# Altium PCB switch-box.PcbDoc (part 3 of 3)
Units mil, origin at the board's own origin, x right, y up, seen from the top; angles counter-clockwise.
Board outline 6943 x 3911 mil, 2 copper layers (Top Layer, Bottom Layer), stack 57 mil thick; 98 components, 104 nets, 383 pads, 129 vias.
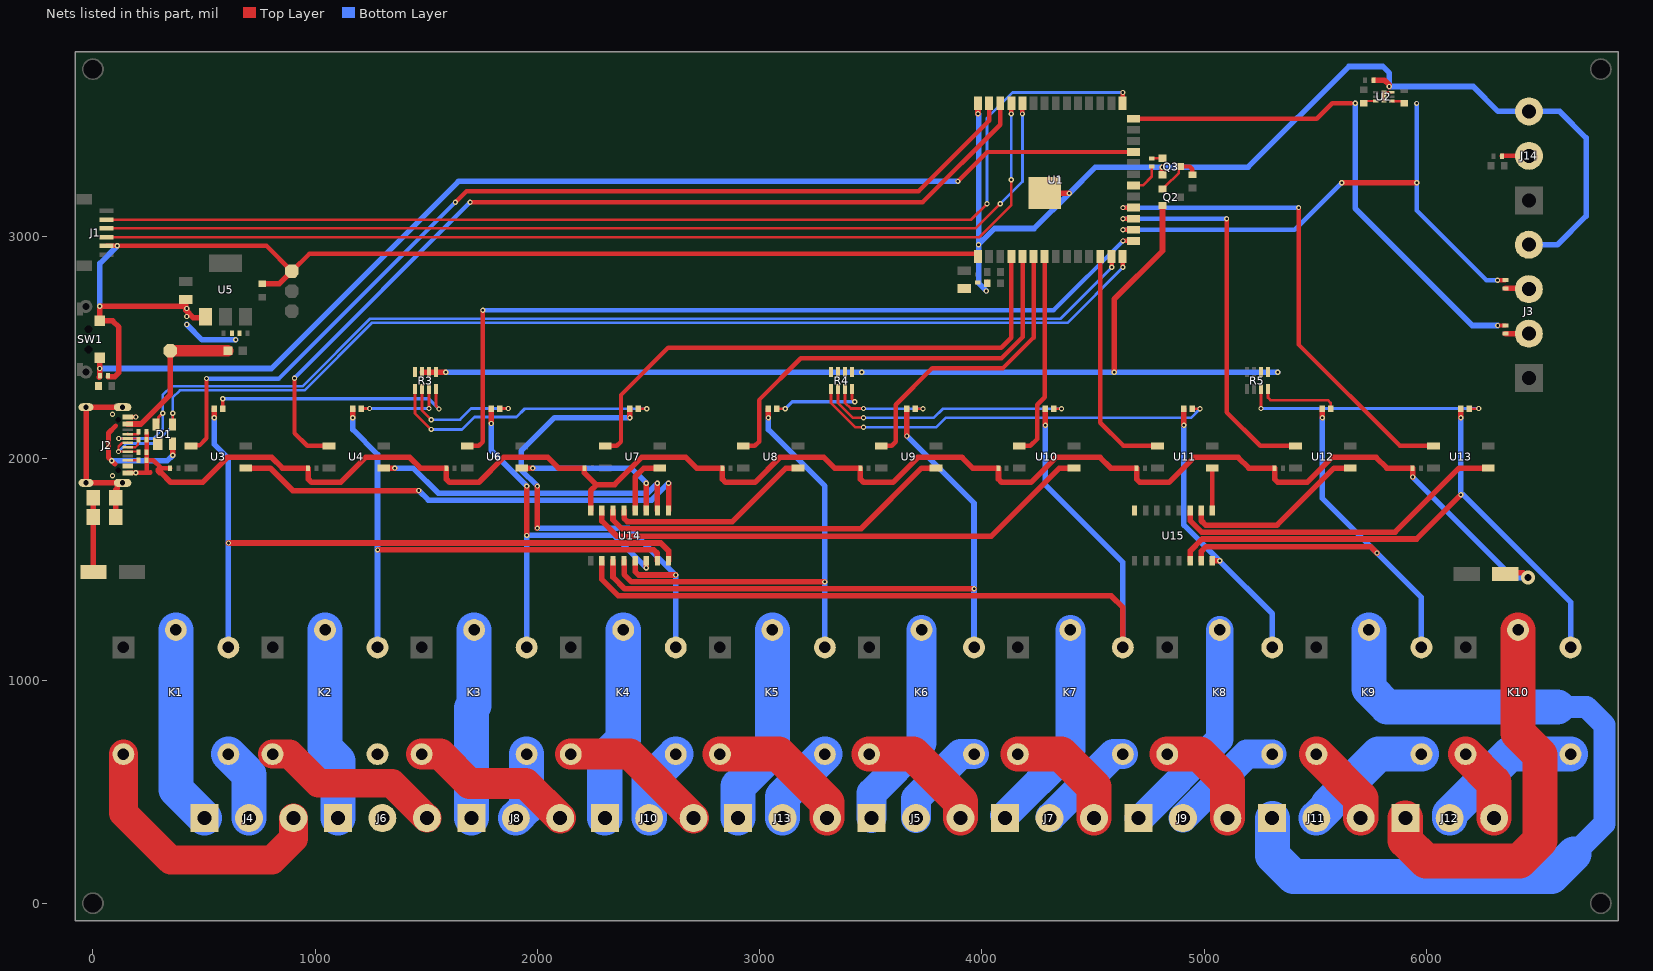
[diagram p2: the nets of this part, all layers, seen from the top]

## Via types
v1: diameter 23.62, hole 11.81, Top Layer to Bottom Layer, tented both sides, 101 vias
v2: diameter 23.62, hole 11.81, Top Layer to Bottom Layer, 18 vias
v3: diameter 62.99, hole 31.5, Top Layer to Bottom Layer, tented both sides, 10 vias

## Nets (pads, with @x,y where several pads share a name; then routed paths per layer and width w, separated by ;. In a path a pad name is that pad's centre, name@x,y a point inside that pad or via, vN(x,y) a via of type N, cw(c..) or ccw(c..) an arc to the next point about the centre after c; other vN are vias at no path point) (continued)
GND: C1.2 C2.2 C3.1 C4.1 C5.2 C8.2 C9.2 C10.2 C11.2 C12.2 C13.2 C14.2 C21.2 C22.2 D1.1 J1.2 J2.A1/B12 J2.B1/A12 J3.4 J14.3 P15.1 Q3.2 R12.1 R13.1 R14.1 R20.1 R21.1 R22.1 R23.1 R24.1 R25.1 R26.1 R27.1 R28.1 R29.1 SW1.2 U1.1 U1.40 U1.41 U2.6 U2.7 U5.1 U14.8 U15.8 | length 19189.1
  Top Layer w10: U2.7@5808.66,3629.46 5808.66,3643.13 5814.69,3649.15 U2.6@5844.78,3649.15
  Top Layer w12: J2.B1/A12@144.19,1935.86 J2.B1/A12@156,1935.86 ; J2.A1/B12@144.19,2187.83 J2.A1/B12@156,2187.83
  Top Layer w20: J1.2@60.7,2957.94 v1(109.51,2957.94) ; v1@110,2957.94 735,2957.94 781.06,2957.94 P15.1@895,2844 974.03,2923.03 3974.68,2923.03 3982.39,2915.31 U1.1@3982.39,2910.51 ; J2.B1/A12@154,1936.83 v1@193,1936.83 ; J2.A1/B12@156,2187.83 193,2187.83 v1(193,2188) v1@193,2189 ; v1(193,1937) 257,1937 259,1939 ; 241.5,1947.57 R13.1@241.5,1993 ; R12.1@241.5,2117.5 C12.2@241.5,2085 C11.2@241.5,2030 R13.1@241.5,1993 ; R20.1@347.5,1958 307,1958 272,1993 R13.1@241.5,1993 ; C3.1@4024,2794 C3.1@4024,2796.04
  Top Layer w25: C10.2@2,1824 2.39,1823.61 C21.2@2.39,1490 ; v1(31,2686) 412,2686 v2@418,2680 ; v1@31.18,2685.82 SW1.2@31.18,2620.4 88.6,2620.4 117,2592 117,2388 99,2370 C4.1@68.5,2370 ; 293,1951 293,1946 301.5,1937.5 306.5,1937.5 350,1894 493.44,1894 605.44,2006 804.44,2006 852.44,1958 R21.1@968.72,1958 968.72,1908.64 983.37,1894 1114.67,1894 1226.67,2006 1425.67,2006 1473.67,1958 R22.1@1589.94,1958 1589.94,1908.64 1604.59,1894 1735.89,1894 1847.89,2006 2046.89,2006 2094.89,1958 R23.1@2211.17,1958 2211.17,1936.83 2265.5,1882.5 ; C9.2@418,2717 v2@418,2680 ; v2(422,2676) v2@418,2680 ; U5.1@506,2640 501,2635 451.2,2635 418,2668.2 v2@418,2680 ; C8.2@762,2787 838,2787 P15.1@895,2844 ; U14.8@2240,1767.19 2240,1857 2265.5,1882.5 ; v1(3982.39,3552.69) U1.40@3982.39,3599.49 ; U1.41@4284.39,3195.94 4286.34,3194 v1(4393,3194) ; v1(4812,3312) 4812,3278.23 Q3.2@4812.63,3277.6 ; C5.2@5765.5,3704 5810.5,3704 5833.31,3681.19 v1(5833.31,3675) ; v1(5938.5,1917.81) R29.1@5938.5,1958 5822.22,1958 5774.22,2006 5575.22,2006 5463.22,1894 5331.92,1894 5317.28,1908.64 R28.1@5317.28,1958 5201,1958 5153,2006 4954,2006 4842,1894 4710.7,1894 4696.06,1908.64 R27.1@4696.06,1958 4579.78,1958 4531.78,2006 4332.78,2006 4220.78,1894 4089.48,1894 4074.83,1908.64 R26.1@4074.83,1958 3958.56,1958 3910.56,2006 3711.56,2006 3599.56,1894 3468.26,1894 3453.61,1908.64 R25.1@3453.61,1958 3337.33,1958 3289.33,2006 3090.33,2006 2978.33,1894 2847.03,1894 2832.39,1908.64 R24.1@2832.39,1958 2716.11,1958 2668.11,2006 2469.11,2006 2347.11,1884 2267,1884 2265.5,1882.5 ; C22.2@6346.61,1488 v3@6436.8,1488
  Bottom Layer w25: v1(31,2686) 31,2879.44 v1(109.51,2957.94) ; v2(422,2604) 491,2535 v2(642,2535) ; v1(3982.39,3552.69) 3985,3550.08 v1(3985,2963.5) ; v1(4020,2755) 3985,2790 v1(3985,2963.5) ; v1(5938.5,1917.81) 6390.66,1465.65 v3(6457.65,1465.65) ; J3.4@6461,2963 6590,2963 6719,3092 6719,3444 6600,3563 J14.3@6462,3563 6323,3563 6211,3675 v1(5833.31,3675) 5833.31,3735.69 5804,3765 5651,3765 5198,3312 v1(4812,3312) 4511,3312 v1(4393,3194) 4235,3036 4057.5,3036 v1(3985,2963.5)
  other v1: 88,1923 88,2200.69
  other v2: 422,2640
IN_1: J4.2 K1.3 | length 326
  Bottom Layer w158: K1.3@609.53,670.74 702,578.27 J4.2@702,383
IN_2: J6.2 K2.3
IN_3: J8.2 K3.3 | length 308
  Bottom Layer w158: J8.2@1902.67,383 1951.56,431.9 K3.3@1951.56,670.74
IN_4: J10.2 K4.3 | length 337.3
  Bottom Layer w158: J10.2@2503,383 2503,551.16 K4.3@2622.58,670.74
IN_5: J13.2 K5.3 | length 365.9
  Bottom Layer w158: J13.2@3102.25,384.08 3102.25,479.39 K5.3@3293.6,670.74
IN_6: J5.2 K6.3 | length 432.1
  Bottom Layer w135: J5.2@3703.67,383 3703.67,471.67 3902.74,670.74 K6.3@3964.61,670.74
IN_7: J7.2 K7.3 | length 442.4
  Bottom Layer w135: J7.2@4308.97,387.97 4591.74,670.74 K7.3@4634.22,670.74
IN_8: J9.2 K8.3 | length 521.8
  Bottom Layer w130: J9.2@4904.33,383 4904.33,383.54 5191.54,670.74 K8.3@5306.65,670.74
IN_9: J11.2 K9.3 | length 596.8
  Bottom Layer w158: J11.2@5504.67,383 5557.67,436.01 5557.67,443.89 5784.53,670.74 K9.3@5977.66,670.74
IN_10: J12.2 K10.3 | length 674
  Bottom Layer w158: J12.2@6105,383 6105,402 6373.74,670.74 K10.3@6648.68,670.74
IO0_: J1.5 U1.27 | length 5085.6
  Top Layer w12: J1.5@60.7,3076.06 3952.06,3076.06 v1(4023,3147)
  Top Layer w20: U1.27@4634.39,3599.49 v1(4634.39,3648.29)
  Bottom Layer w12: v1(4023,3147) 4023,3533 4138.29,3648.29 v1(4634.39,3648.29)
IO12: R16.2 U1.20 | length 142
  Top Layer w12: U1.20@4683.61,3230.2 4725.2,3230.2 4764,3269 R16.2@4764,3314.5
IO_1: U1.39 U3.1 | length 4432.2
  Top Layer w20: U3.1@441.24,2058 443.24,2060 479.28,2060 511,2091.72 v1(511,2361) ; v1(1631,3154) 1681,3204 3715,3204 4032.39,3521.39 U1.39@4032.39,3599.49
  Bottom Layer w20: v1(511,2361) 837,2361 1629.31,3153.31 v1@1630,3153.98
IO_2: U1.38 U4.1 | length 4170.5
  Top Layer w20: v1(907,2362.81) 907,2115 964,2058 U4.1@1062.48,2058 ; v1(1697,3154) 3733,3154 4082.39,3503.39 U1.38@4082.39,3599.49
  Bottom Layer w20: v1@907,2364 907.21,2364 908.81,2365.6 908.81,2365.81 v1(1697,3154)
IO_3: U1.15 U6.1 | length 3725.8
  Top Layer w20: U6.1@1683.72,2058 1735.65,2058 1754.75,2077.1 v1(1754.75,2667.75) ; v1(4634.8,2980.2) U1.15@4681.61,2980.2
  Bottom Layer w20: v1@1754.75,2668 4322.61,2668 v1(4634.8,2980.2)
IO_4: U1.4 U7.1 | length 2518
  Top Layer w20: U7.1@2304.96,2058 2356.89,2058 2375.99,2077.1 2375.99,2286.99 2588,2499 4087,2499 4132.39,2544.39 U1.4@4132.39,2910.51
IO_5: U1.5 U8.1 | length 1933.7
  Top Layer w20: U8.1@2926.2,2058 2978.13,2058 2997.23,2077.1 2997.23,2264.23 3185,2452 4088.23,2452 4184,2547.77 4184,2908.91 U1.5@4182.39,2910.51
IO_6: U1.6 U9.1 | length 1349.8
  Top Layer w20: U9.1@3547.44,2058 3547.51,2058.08 3594.08,2058.08 3612,2076 3612,2243 3777,2408 4095,2408 4232.39,2545.39 U1.6@4232.39,2910.51
IO_7: U1.7 U10.1 | length 928.5
  Top Layer w20: U10.1@4168.67,2058 4218,2058 4249,2089 4249,2242.8 4282.39,2276.2 U1.7@4282.39,2910.51
IO_8: U1.12 U11.1 | length 1048.8
  Top Layer w20: U1.12@4532.39,2910.51 4532.39,2162.61 4637,2058 U11.1@4789.91,2058
IO_9: U1.17 U12.1 | length 1758.5
  Top Layer w20: v1(4634.8,3080.2) U1.17@4681.61,3080.2 U1.17@4683.61,3080.2 ; v1(5101,3080) 5101,2209 5252,2058 U12.1@5411.15,2058
  Bottom Layer w20: v1@4635,3080 v1(5101,3080)
IO_10: U1.18 U13.1 | length 2249.5
  Top Layer w20: v1(4634.8,3130.2) U1.18@4681.61,3130.2 ; v1(5425,3130.2) 5425,2514 5881,2058 U13.1@6032.39,2058
  Bottom Layer w20: v1(4634.8,3130.2) v1(5425,3130.2)
LED_VCC: Q2.2 R3.1 R3.2 R3.3 R3.4 R4.1 R4.2 R4.3 R4.4 R5.1 R5.2 | length 4690.1
  Top Layer w25: R3.3@1480.87,2389.82 R3.2@1512.36,2389.82 R3.1@1543.86,2389.82 v2(1587.82,2389.82) ; v1(4595.63,2389.82) 4595.63,2718.63 4812.63,2935.63 Q2.2@4812.63,3139.6
  Bottom Layer w25: v2(1587.82,2389.82) v2(3459.56,2389.82) v1(4595.63,2389.82) v2(5331.3,2389.82)
NC_1: J4.1 K1.4 | length 900.1
  Bottom Layer w158: K1.4@373.31,1229.8 373.31,511.69 J4.1@502,383
NC_2: J6.1 K2.4 | length 870.8
  Bottom Layer w158: K2.4@1044.33,1229.8 1044.33,698.67 1102.33,640.67 J6.1@1102.33,383
NC_3: J8.1 K3.4 | length 852
  Bottom Layer w158: J8.1@1702.67,383 1702.67,877.67 1715.34,890.34 K3.4@1715.34,1229.8
NC_4: J10.1 K4.4 | length 881.3
  Bottom Layer w158: J10.1@2303,383 2303,656 2386.36,739.36 K4.4@2386.36,1229.8
NC_5: J13.1 K5.4 | length 910.6
  Bottom Layer w158: J13.1@2903.33,383 2903.33,526.33 3057.38,680.38 K5.4@3057.38,1229.8
NC_6: J5.1 K6.4 | length 939.9
  Bottom Layer w135: J5.1@3503.67,383 3503.67,495.67 3728.39,720.39 K6.4@3728.39,1229.8
NC_7: J7.1 K7.4 | length 956.6
  Bottom Layer w135: J7.1@4104,395 4398,689 K7.4@4398,1229.8
NC_8: J9.1 K8.4 | length 1004
  Bottom Layer w125: J9.1@4704.83,383.49 4715.49,383.49 5070.43,738.43 K8.4@5070.43,1229.8
NC_9: J11.1 K9.4 | length 3636.4
  Bottom Layer w100: J11.1@5304.67,383 J11.1@5307,380.67 ; 6589,883 6720,883 6801,802 6801,358 6665,222
  Bottom Layer w158: J11.1@5307,380.67 5307,215 5402,120 6563,120 6665,222 ; K9.4@5741.44,1229.8 5741.44,965.56 5824,883 6589,883
NC_10: J12.1 K10.4 | length 1771.2
  Top Layer w158: J12.1@5905,383 5905,282.55 5997.55,190 6418.45,190 6511,282.55 6511,667 6412.46,765.54 K10.4@6412.46,1229.8
NetJ2_A5: J2.A5 R12.2 | length 47.5
  Top Layer w12: J2.A5@156.03,2111.03 R12.2@203.47,2111.03
NetJ2_B5: J2.B5 R13.2 | length 49.8
  Top Layer w12: J2.B5@156,1992.94 200.5,1992.94 203.5,1995.94 R13.2@203.5,1997
NetJ3_2: J3.2 R7.1 | length 105.9
  Top Layer w25: R7.1@6356,2562.5 6460.5,2562.5 J3.2@6461,2563
  Bottom Layer w20: J3.2@6460.5,2562.5 J3.2@6461,2563
NetJ3_3: J3.3 R8.1 | length 106.4
  Top Layer w25: R8.1@6356,2766.5 6457.5,2766.5 J3.3@6461,2763
NetJ14_2: J14.2 R6.1 | length 122.9
  Top Layer w20: R6.1@6339.5,3362 6340,3362.5 6461.5,3362.5 J14.2@6462,3363
NetLED1_1: LED1.1 R3.8 | length 1132.1
  Top Layer w12: R3.8@1543.86,2313.05 1543.86,2237.14 v1(1557,2224)
  Top Layer w15: LED1.1@583.76,2225 v1(583.76,2270.24)
  Bottom Layer w15: v1(583.76,2270.24) 1510.76,2270.24 v1(1557,2224)
NetLED2_1: LED2.1 R3.7 | length 392.4
  Top Layer w12: LED2.1@1207,2226 v1(1245,2226) ; v1(1512.36,2226) R3.7@1512.36,2313.05
  Bottom Layer w12: v1(1245,2226) v1(1512.36,2226)
NetLED3_1: LED3.1 R3.6 | length 559
  Top Layer w12: R3.6@1480.87,2313.05 1480.87,2217.13 v1(1522,2176) ; LED3.1@1830.24,2226 v1(1868.24,2226)
  Bottom Layer w12: v1(1522,2176) 1652,2176 1702,2226 v1(1868.24,2226)
NetLED4_1: LED4.1 R3.5 | length 1257.1
  Top Layer w12: R3.5@1449.37,2313.05 1449.37,2204.63 v1(1522,2132) ; LED4.1@2453.48,2225 v1(2491.48,2225)
  Bottom Layer w12: v1(1522,2132) 1661,2132 1717,2188 1906,2188 1943,2225 v1(2491.48,2225)
NetLED5_1: LED5.1 R4.8 | length 425.7
  Top Layer w12: LED5.1@3076.72,2225 v1(3114.72,2225) ; R4.8@3415.6,2313.05 3415.6,2269.4 v2(3428,2257)
  Bottom Layer w15: v1(3114.72,2225) 3146.72,2257 v2(3428,2257)
NetLED6_1: LED6.1 R4.7 | length 458.1
  Top Layer w12: R4.7@3384.1,2313.05 3384.1,2251.9 3410,2226 v1(3467,2226) ; LED6.1@3699.96,2225 v1(3734.95,2225)
  Bottom Layer w12: v1(3467,2226) 3467.5,2225.5 3734.45,2225.5 v1(3734.95,2225)
NetLED7_1: LED7.1 R4.6 | length 1150.1
  Top Layer w12: R4.6@3352.61,2313.05 3352.61,2251.39 3420,2184 v1(3467,2184) ; LED7.1@4323.19,2225 v1(4358.19,2225) v1@4361.19,2225
  Bottom Layer w12: v1(3467,2184) 3783,2184 3824,2225 v1(4358.19,2225)
NetLED8_1: LED8.1 R4.5 | length 1837
  Top Layer w12: R4.5@3321.11,2313.05 3321.11,2250.89 3430,2142 v1(3467,2142) ; LED8.1@4946.43,2225 v1(4981.43,2225)
  Bottom Layer w12: v1(3467,2142) 3795,2142 3837,2184 4940.43,2184 v1(4981.43,2225)
NetLED9_1: LED9.1 R5.8 | length 356.4
  Top Layer w12: R5.8@5287.34,2313.05 5287.34,2275.18 5298.53,2264 5557,2264 5569.67,2251.33 LED9.1@5569.67,2225
NetLED10_1: LED10.1 R5.7 | length 1110.6
  Top Layer w12: v1(5256,2226) R5.7@5256,2313.05 ; LED10.1@6192.91,2225 6193.41,2225.5 6235.5,2225.5 v1(6236,2226)
  Bottom Layer w12: v1(5256,2226) v1(6236,2226)
NetQ2_1: Q2.1 Q3.3 Rx1.2 | length 225
  Top Layer w12: Q2.1@4812.63,3214.4 4814.6,3214.4 4824.74,3224.54 4886.12,3285.92 4886.12,3309.75 Q3.3@4891.37,3315
  Top Layer w20: Q3.3@4891.37,3315 4935,3315 4947,3303 Rx1.2@4947,3273
NetQ3_1: Q3.1 R16.1 | length 49
  Top Layer w12: R16.1@4764,3351.5 4764.45,3351.95 4812.18,3351.95 Q3.1@4812.63,3352.4
NO_1: J4.3 K1.5 | length 1249.4
  Top Layer w130: K1.5@137.09,670.74 137.09,406.83 350.02,193.89 805.2,193.89 902,290.69 J4.3@902,383
NO_2: J6.3 K2.5 | length 813.4
  Top Layer w130: K2.5@808.11,670.74 885.05,670.74 1015.79,540 1345.33,540 J6.3@1502.33,383
NO_3: J8.3 K3.5 | length 742.7
  Top Layer w140: K3.5@1479.12,670.74 1562.65,670.74 1694.73,538.66 1947.01,538.66 J8.3@2102.67,383
NO_4: J10.3 K4.5 | length 672
  Top Layer w140: K4.5@2150.14,670.74 2415.26,670.74 J10.3@2703,383
NO_5: J13.3 K5.5 | length 642.2
  Top Layer w158: K5.5@2821.16,670.74 3085.26,670.74 3303.33,452.67 J13.3@3303.33,383
NO_6: J5.3 K6.5 | length 574.2
  Top Layer w158: K6.5@3492.17,670.74 3690.26,670.74 3903.67,457.33 J5.3@3903.67,383
NO_7: J7.3 K7.5 | length 543.4
  Top Layer w158: K7.5@4161.78,670.74 4356.26,670.74 4504,523 J7.3@4504,383
NO_8: J9.3 K8.5 | length 484
  Top Layer w158: K8.5@4834.21,670.74 4978.26,670.74 5104.33,544.67 J9.3@5104.33,383
NO_9: J11.3 K9.5 | length 370.4
  Top Layer w158: K9.5@5505.22,670.74 5704.67,471.3 J11.3@5704.67,383
NO_10: J12.3 K10.5 | length 341.1
  Top Layer w158: K10.5@6176.24,670.74 6305,541.98 J12.3@6305,383
OUT_1: U3.3 U14.1 | length 2116.7
  Top Layer w25: U3.3@687.31,1958 798,1958 899,1857 v1(1466,1857) ; U14.1@2590,1767.19 v1(2590,1890)
  Bottom Layer w25: v1(1466,1857) 1509.06,1813.94 2513.94,1813.94 v1(2590,1890)
OUT_2: U4.3 U14.2 | length 1419.8
  Top Layer w25: U4.3@1308.54,1958 v1(1357.54,1958) ; U14.2@2540,1767.19 v1(2540,1890)
  Bottom Layer w25: v1(1357.54,1958) 1441,1958 1554.06,1844.94 2494.94,1844.94 v1(2540,1890)
OUT_3: U6.3 U14.3 | length 711.2
  Top Layer w25: U6.3@1929.78,1958 v1(1978.78,1958) ; U14.3@2490,1767.19 v1(2490,1890)
  Bottom Layer w25: v1(1978.78,1958) 2422,1958 v1(2490,1890)
OUT_4: U7.3 U14.4 | length 279
  Top Layer w25: U14.4@2440,1767.19 2440,1919 2479,1958 U7.3@2551.02,1958
OUT_5: U8.3 U14.5 | length 923.7
  Top Layer w25: U14.5@2390,1767.19 2390,1731.64 2404.64,1717 2877,1717 3118,1958 U8.3@3172.26,1958
OUT_6: U9.3 U14.6 | length 1624.5
  Top Layer w25: U14.6@2340,1767.19 2340,1725 2379,1686 3457,1686 3729,1958 U9.3@3793.5,1958
OUT_7: U10.3 U14.7 | length 2327.4
  Top Layer w25: U14.7@2290,1767.19 2290,1719 2357,1652 4043,1652 4349,1958 U10.3@4414.74,1958
OUT_8: U11.3 U15.1 | length 191.2
  Top Layer w20: U11.3@5035.98,1958 5035.98,1768.21 U15.1@5037,1767.19
OUT_9: U12.3 U15.2 | length 844.9
  Top Layer w25: U15.2@4987,1767.19 4987,1721 5007,1701 5328,1701 5585,1958 U12.3@5657.21,1958 U12.3@5671,1958
OUT_10: U13.3 U15.3 | length 1527.5
  Top Layer w25: U15.3@4937,1767.19 4937,1722 4989,1670 5859,1670 6147,1958 U13.3@6278.45,1958
RET_K1: K1.2 LED1.2 U14.16 | length 3139.8
  Top Layer w25: v1(546.36,2184.81) LED1.2@546.36,2225 ; v1(610,1621) 2555,1621 2590,1586 U14.16@2590,1540.81
  Bottom Layer w25: v1(546.36,2184.81) 546.36,2064.64 609.53,2001.47 K1.2@609.53,1151.06
RET_K2: K2.2 LED2.2 U14.15 | length 2419.7
  Top Layer w25: v1(1169.6,2184.81) LED2.2@1169.6,2225 LED2.2@1169.6,2226 ; v1(1281,1590) 2524,1590 2539.31,1574.69 2539.31,1541.5 U14.15@2540,1540.81
  Bottom Layer w25: v1(1169.6,2184.81) 1169.6,2130.81 1280.55,2019.86 K2.2@1280.55,1151.06
RET_K3: K3.2 LED3.2 U14.14 | length 1769.7
  Top Layer w25: v1(1792.84,2158.81) LED3.2@1792.84,2225 ; v1(1952,1655) v1(1952,1877) ; v1(2490,1509) U14.14@2490,1540.81
  Bottom Layer w25: v1(1792.84,2158.81) 1792.84,2036.16 v1(1952,1877) ; K3.2@1951.56,1151.06 v1@1951.56,1654.56 ; v1(1952,1655) 2344,1655 v1(2490,1509)
RET_K4: K4.2 LED4.2 U14.13 | length 2240.3
  Top Layer w25: v1(2000,1688) v1(2000,1877) ; v1(2416.08,2184.81) LED4.2@2416.08,2225 ; U14.13@2440,1540.81 2440,1492 2455,1477 v1(2622,1477)
  Bottom Layer w25: v1(2000,1688) 2411,1688 v1(2622,1477) ; v1(2000,1877) 1927,1950 1927,2034 2077.81,2184.81 v1(2416.08,2184.81) ; K4.2@2622.58,1151.06 v1@2622.58,1477
RET_K5: K5.2 LED5.2 U14.12 | length 2157.2
  Top Layer w25: U14.12@2390,1540.81 2390,1480 2424,1446 v1(3293,1446) ; v1(3039.32,2184.81) LED5.2@3039.32,2225
  Bottom Layer w25: v1(3039.32,2184.81) 3039.32,2130.81 3293.6,1876.53 K5.2@3293.6,1151.06
RET_K6: K6.2 LED6.2 U14.11 | length 2919.4
  Top Layer w25: U14.11@2340,1540.81 2340,1467 2392,1415 v1(3965,1415) ; v1(3662.55,2102.55) LED6.2@3662.55,2225
  Bottom Layer w25: v1(3662.55,2102.55) 3964.61,1800.49 3964.61,1415 K6.2@3964.61,1151.06
RET_K7: K7.2 LED7.2 U14.10 | length 3878.3
  Top Layer w25: U14.10@2290,1540.81 2290,1457 2364,1383 4582,1383 4634.22,1330.78 K7.2@4634.22,1151.06 ; v1(4285.79,2150.81) LED7.2@4285.79,2225
  Bottom Layer w25: v1(4285.79,2150.81) 4285.79,1882.21 4634.22,1533.78 K7.2@4634.22,1151.06
RET_K8: K8.2 LED8.2 U15.16 | length 1270.7
  Top Layer w25: v1(4909.03,2150.81) LED8.2@4909.03,2225 ; U15.16@5037,1540.81 5037.19,1541 v1(5070,1541)
  Bottom Layer w25: v1(4909.03,2150.81) 4909.03,1701.97 v1(5070,1541) ; v1@5070,1540 5306.65,1303.35 K8.2@5306.65,1151.06
RET_K9: K9.2 LED9.2 U15.15 | length 2112.7
  Top Layer w25: U15.15@4987,1540.81 4987.69,1541.5 4987.69,1583.69 5009,1605 5749,1605 v1(5778,1576) ; v1(5532.27,2184.81) LED9.2@5532.27,2225
  Bottom Layer w25: v1(5532.27,2184.81) 5532.27,1821.73 v1(5778,1576) 5977.66,1376.34 K9.2@5977.66,1151.06
RET_K10: K10.2 LED10.2 U15.14 | length 2651.8
  Top Layer w25: U15.14@4937,1540.81 4937.69,1541.5 4937.69,1585.69 4991,1639 5956,1639 v1(6155.51,1838.51) ; v1(6155.51,2184.81) LED10.2@6155.51,2225
  Bottom Layer w25: v1(6155.51,2184.81) v1(6155.51,1838.51) 6165.49,1838.51 6648.68,1355.32 K10.2@6648.68,1151.06
RST_: C4.2 R2.1 SW1.1 U1.23 | length 5148.2
  Top Layer w20: v1(3892,3248) 4024.2,3380.2 U1.23@4681.61,3380.2
  Top Layer w25: R2.1@25,2322 R2.1@27.5,2324.5 ; C4.2@27.5,2366 31.5,2370 31.18,2370.32 v1(31.18,2406.24) SW1.1@31.18,2455.05
  Bottom Layer w25: v1(31.18,2406.24) 803.24,2406.24 1645,3248 v1(3892,3248)
RXD_: J1.4 U1.36 | length 4564.8
  Top Layer w12: J1.4@57,3035 58.69,3036.69 J1.4@60.7,3036.69 3972.19,3036.69 v1(4082.5,3147)
  Top Layer w20: v1(4182.39,3551.69) U1.36@4182.39,3598.49
  Bottom Layer w12: v1(4082.5,3147) 4182.39,3246.89 v1(4182.39,3551.69)
SCL: R7.2 R17.1 U1.26 U2.3 | length 2419.4
  Top Layer w10: R17.1@5728.54,3609.78 U2.3@5772.54,3609.78
  Top Layer w20: U1.26@4683.61,3530.2 5507.2,3530.2 5577,3600 5662,3600 ; v1(6320.5,2599.5) R7.2@6356,2599.5
  Bottom Layer w25: v1(5680,3600) 5680,3126 6206.5,2599.5 v1(6320.5,2599.5)
SDA: R8.2 R18.1 U1.16 U2.4 | length 2529.2
  Top Layer w10: U2.4@5844.78,3609.78 5845,3610 5846.13,3608.87 5890.13,3608.87 R18.1@5900,3599
  Top Layer w20: v1(4634.8,3030.2) U1.16@4681.61,3030.2 U1.16@4683.61,3030.2 ; v1(6320,2803) R8.2@6355.5,2803
  Top Layer w25: v1(5619.8,3242.2) v1(5956.2,3242.2)
  Bottom Layer w20: v1(4634.8,3030.2) 5407.8,3030.2 v1(5619.8,3242.2) ; v1@5956,3242.2 v1(5956,3599) ; v1(5956.2,3242.2) 5956.2,3117 6270.2,2803 v1(6320,2803)
Shell_: C10.1 J2.S1 J2.S2 J2.S3 J2.S4 R14.2 | length 830.7
  Top Layer w25: R14.2@102,1738 C10.1@102,1824 102,1860.01 109.91,1867.92 109.91,1886.75 J2.S1@114.73,1891.57 ; J2.S1@133.56,1891.57 J2.S1@114.73,1891.57 ; J2.S4@133.56,2232.12 J2.S3@-31.01,2232.12 J2.S2@-31.01,1891.57 J2.S1@114.73,1891.57
  Bottom Layer w25: J2.S3@-31.01,2232.12 J2.S3@-29.5,2230.61
TXD_: J1.3 U1.37 | length 4588.2
  Top Layer w12: J1.3@61,2997.31 3988.32,2997.32 4132.39,3141.39 v1(4132.39,3255.39)
  Top Layer w20: v1(4132.39,3551.69) U1.37@4132.39,3598.49
  Bottom Layer w12: v1(4132.39,3255.39) v1(4132.39,3551.69)
USB_DM: C12.1 D1.4 J2.A7 J2.B7 U1.13 | length 5153.5
  Top Layer w10: v1(116,2091.37) J2.B7@156,2091.37 ; J2.A7@156,2052 191,2052 202.89,2063.89 202.89,2083.39 C12.1@204.5,2085 198.04,2091.46 J2.B7@156.91,2091.46
  Top Layer w12: D1.4@284.2,2153.61 293.94,2163.36 293.94,2184.94 v1(314,2205)
  Top Layer w20: v1(4584.39,2861.71) U1.13@4584.39,2910.51
  Bottom Layer w12: v1(116,2091.37) 272.37,2091.37 314,2133 v1(314,2205) 314,2286 354,2326 943.54,2326 1247.54,2630 4352.69,2630 v1(4584.39,2861.71)
USB_DP: C11.1 D1.3 J2.A6 J2.B6 U1.14 | length 5198.9
  Top Layer w10: J2.B6@155.09,2032.22 v1(115.09,2032.22) 115.09,2055.09 130.78,2070.78 155.09,2070.78 J2.A6@156,2071.69 ; J2.B6@155.09,2033.22 J2.B6@156,2032.31 J2.B6@156.91,2031.41 ; J2.B6@156.91,2032.41 C11.1@203.09,2032.41 ; C11.1@203.09,2031.41 C11.1@204.5,2030
  Top Layer w12: D1.3@359,2153.61 v1(359,2205)
  Top Layer w20: v1(4634.39,2861.71) U1.14@4634.39,2910.51
  Bottom Layer w12: v1(115.09,2032.22) 151.87,2069 280,2069 359,2148 v1(359,2205) 359,2275 392,2308 951,2308 1254.51,2611.51 4384.19,2611.51 v1(4634.39,2861.71)
VUSB: D1.2 F1.1 J2.A4/B9 J2.B4/A9 P2.1 | length 1245.5
  Top Layer w12: J2.A4/B9@151.09,2151.42 J2.A4/B9@156,2156.33
  Top Layer w22: 98.64,1976.36 v1(84.32,1990.68) 70,2005 70,2116 102.51,2148.51
  Top Layer w25: J2.A4/B9@156,2156.33 215.33,2156.33 348.39,2289.39 P2.1@348.39,2486 ; v1(359,2015.61) D1.2@359,2067
  Top Layer w50: P2.1@347,2486 P2.1@348,2486 348.39,2486 F1.1@607.54,2486
  Bottom Layer w25: v1(84.32,1990.68) 334.07,1990.68 v1(359,2015.61)
pads on no net: J1.MP1 J1.MP2 J2.A8 J2.B8 J2.MH R5.3 R5.4 R5.5 R5.6 SW1.3 SW1.4 SW1.5 SW1.6 SW1.MH0 SW1.MH1 U1.8 U1.9 U1.10 U1.11 U1.19 U1.22 U1.24 U1.25 U1.28 U1.29 U1.30 U1.31 U1.32 U1.33 U1.34 U1.35 U2.2 U2.5 U15.4 U15.5 U15.6 U15.7 U15.10 U15.11 U15.12 U15.13

## Polygon pours and split planes (outlines as drawn)
GND on Top Layer "GND_L01_P000" (hatched 45Degree grid 20 track 8, remove dead copper, pour order 0): -22,3776 6807,3776 6807,1435 -22,1435
GND on Bottom Layer "GND_L02_P001" (hatched 45Degree grid 20 track 8, remove dead copper, pour order 1): -22,3776 6807,3776 6807,1435 -22,1435

## Other copper
Top Layer:
  rectangle net LED_VCC: 5246,2362 5348.1,2415
  rectangle net LED_VCC: 3309.36,2362 3476.36,2415
  rectangle net LED_VCC: 1437.61,2362 1604.61,2415
  rectangle net GND: 234,1925 314,2096
  rectangle net GND: 78,2193.69 180,2208.69
  rectangle net GND: 78,1915 180,1930
  rectangle net GND: -62,1381 50,1862
  rectangle net VUSB: 97,1965.69 179,1980.69
  rectangle net VUSB: 97,2143 184,2158
  rectangle net RST_: 10,2306 44,2386
  rectangle net Data: 6275,3300 6313,3377
  rectangle net 3V3: 5700,3643 5739,3718
  rectangle net GND: 3888,2741 4043.75,2810.75
  rectangle net GND: 3959,2881 4005,2977
  rectangle net 3V3: 3887,2822 4054,2870
  rectangle net GND: 6287,1377 6515,1527
  rectangle net 5V: 4866,3141 4966,3233
  region net 5V: 868,2097 868,2493 748,2493 748,2097
  rectangle net 5V: 4639,1391 4714,1621
  rectangle net 5V: 4647,1391 5117,1485
  rectangle net 5V: 5093,1392 6247,1525
  rectangle net 5V: 4639,1593 4727,1658
  rectangle net 5V: 2768,1503 4714,1611
  rectangle net 5V: 85,1456 2258,1564
  rectangle net 5V: 685,2466 933,2561
  rectangle net 3V3: 383,2773 727,2938
  region net GND: 544.4,2743.84 379,2743.84 379,2523 544.4,2523
  region net SCL: 5785.67,3616.91 5662,3616.91 5662,3575.91 5785.67,3575.91
  rectangle net SDA: 5833,3576 5971,3617
  rectangle net GND: 617,2519 669,2583
  region net 5V: 655,2746.5 655,2596 788,2596 788,2746.5
  region net 5V: 933,2705 685,2705 685,2546 933,2546
  rectangle net 3V3: 563,2523 603,2610
  rectangle net 3V3: 563,2597 637,2790
  rectangle net GND: 5798,3643 5857,3718
  rectangle net 3V3: 5700,3643 5787,3676
  rectangle net 3V3: 4011,2822 4054,2977
Bottom Layer:
  rectangle net IN_2: 1214,316 1375,735
  rectangle net 5V: 790,2589 842,2706
  rectangle net 3V3: 385,2738 939,2958

## Silkscreen, mask and mechanical layers (free items; w line width, h text height)
Top Overlay:
  drawing of 313 lines, arcs and shapes, not listed
  text "Note:" at 76,3739 h100
  text "JLCJLCJLCJLC" at 2971,3712.02 h85
  text "* >>Cap TBD" at 76,3630.6 h100
  text "SENSOR" at 5627.9,3499.79 h100
  text "GND" at 6139.96,2912.11 h120
  text "GND" at 934.96,2807.79 h100
  text "PROGRAM." at 182.21,2769.52 h100 r90
  text "SDA" at 6094.96,2729.12 h120
  text "3V3" at 934.96,2716.94 h100
  text "5V" at 934.96,2626.26 h100
  text "SCL" at 6093.96,2528.12 h120
  text "RESET" at 138.21,2406.02 h100 r90
  text "VUSB" at 214.85,2370.79 h100
  text "3V3" at 6139.96,2317.62 h120
  text "~" at 233.98,2030.14 h28
  text "~" at 262,1993.67 h28
  text "NC1" at 418.76,-74.89 h75
  text "IN1" at 630.42,-74.89 h75
  text "NO1" at 812.59,-74.91 h75
  text "NC2" at 1019.09,-74.89 h75
  text "IN2" at 1230.76,-74.89 h75
  text "NO2" at 1412.92,-74.91 h75
  text "NC3" at 1619.42,-74.91 h75
  text "IN3" at 1831.09,-74.89 h75
  text "NO3" at 2013.26,-74.91 h75
  text "NC4" at 2219.76,-74.89 h75
  text "IN4" at 2431.42,-74.89 h75
  text "NO4" at 2613.59,-74.91 h75
  text "NC5" at 2820.09,-74.91 h75
  text "IN5" at 3031.76,-74.89 h75
  text "NO5" at 3213.92,-74.91 h75
  text "NC6" at 3420.42,-74.91 h75
  text "IN6" at 3632.09,-74.89 h75
  text "NO6" at 3814.26,-74.91 h75
  text "NC7" at 4020.76,-74.89 h75
  text "IN7" at 4232.42,-74.89 h75
  text "NO7" at 4414.59,-74.91 h75
  text "NC8" at 4621.09,-74.91 h75
  text "IN8" at 4832.76,-74.89 h75
  text "NO8" at 5014.92,-74.91 h75
  text "NC9" at 5221.42,-74.91 h75
  text "IN9" at 5433.09,-74.89 h75
  text "NO9" at 5615.26,-74.91 h75
  text "NC10" at 5821.76,-74.91 h75
  text "IN10" at 6033.42,-74.89 h75
  text "NO10" at 6215.59,-74.91 h75
Bottom Overlay:
  drawing of 3070 lines, arcs and shapes, not listed
  text "ZERO CARBON FOOTPRINT" at 3875.24,2223.71 h45
Board Outline:
  lines w10: 66,1054 241,1054 241,1354.14 ; 66,1055 66,1356.14 27,1356.14 27,1016 280,1016 280,1313.14 ; 241,1356.14 523,1356.14 ; 280,1315.14 484,1315.14 ; 484,1315 484,1011.86 523,1011.86 523,1353 ; 737.02,1054 912.02,1054 912.02,1354.14 ; 737.02,1055 737.02,1356.14 698.02,1356.14 698.02,1016 951.02,1016 951.02,1313.14 ; 912.02,1356.14 1194.02,1356.14 ; 951.02,1315.14 1155.02,1315.14 ; 1155.02,1315 1155.02,1011.86 1194.02,1011.86 1194.02,1353 ; 1408.03,1054 1583.03,1054 1583.03,1354.14 ; 1408.03,1055 1408.03,1356.14 1369.03,1356.14 1369.03,1016 1622.03,1016 1622.03,1313.14 ; 1583.03,1356.14 1865.03,1356.14 ; 1622.03,1315.14 1826.03,1315.14 ; 1826.03,1315 1826.03,1011.86 1865.03,1011.86 1865.03,1353 ; 2079.05,1054 2254.05,1054 2254.05,1354.14 ; 2079.05,1055 2079.05,1356.14 2040.05,1356.14 2040.05,1016 2293.05,1016 2293.05,1313.14 ; 2254.05,1356.14 2536.05,1356.14 ; 2293.05,1315.14 2497.05,1315.14 ; 2497.05,1315 2497.05,1011.86 2536.05,1011.86 2536.05,1353 ; 2750.07,1054 2925.07,1054 2925.07,1354.14 ; 2750.07,1055 2750.07,1356.14 2711.07,1356.14 2711.07,1016 2964.07,1016 2964.07,1313.14 ; 2925.07,1356.14 3207.07,1356.14 ; 2964.07,1315.14 3168.07,1315.14 ; 3168.07,1315 3168.07,1011.86 3207.07,1011.86 3207.07,1353 ; 3421.08,1054 3596.08,1054 3596.08,1354.14 ; 3421.08,1055 3421.08,1356.14 3382.08,1356.14 3382.08,1016 3635.08,1016 3635.08,1313.14 ; 3596.08,1356.14 3878.08,1356.14 ; 3635.08,1315.14 3839.08,1315.14 ; 3839.08,1315 3839.08,1011.86 3878.08,1011.86 3878.08,1353 ; 4090.69,1054 4265.69,1054 4265.69,1354.14 ; 4090.69,1055 4090.69,1356.14 4051.69,1356.14 4051.69,1016 4304.69,1016 4304.69,1313.14 ; 4265.69,1356.14 4547.69,1356.14 ; 4304.69,1315.14 4508.69,1315.14 ; 4508.69,1315 4508.69,1011.86 4547.69,1011.86 4547.69,1353 ; 4763.12,1054 4938.12,1054 4938.12,1354.14 ; 4763.12,1055 4763.12,1356.14 4724.12,1356.14 4724.12,1016 4977.12,1016 4977.12,1313.14 ; 4938.12,1356.14 5220.12,1356.14 ; 4977.12,1315.14 5181.12,1315.14 ; 5181.12,1315 5181.12,1011.86 5220.12,1011.86 5220.12,1353 ; 5434.13,1054 5609.13,1054 5609.13,1354.14 ; 5434.13,1055 5434.13,1356.14 5395.13,1356.14 5395.13,1016 5648.13,1016 5648.13,1313.14 ; 5609.13,1356.14 5891.13,1356.14 ; 5648.13,1315.14 5852.13,1315.14 ; 5852.13,1315 5852.13,1011.86 5891.13,1011.86 5891.13,1353 ; 6105.15,1054 6280.15,1054 6280.15,1354.14 ; 6105.15,1055 6105.15,1356.14 6066.15,1356.14 6066.15,1016 6319.15,1016 6319.15,1313.14 ; 6280.15,1356.14 6562.15,1356.14 ; 6319.15,1315.14 6523.15,1315.14 ; 6523.15,1315 6523.15,1011.86 6562.15,1011.86 6562.15,1353 ; -79,-79 -79,3832 6864,3832 6864,-79 -79,-79

## Dimensions
6864,3832 to -79,3832 on Dimension
6864,-79 to 6864,3832 on Dimension

## Text inside footprints (layer, text, board x,y; h text height)
J2: Top Overlay "Board Edge" at -24,2203 h30 r270